# Altium PCB FPV_Template.PcbDoc
Units mm, origin at the board's own origin, x right, y up, seen from the top; angles counter-clockwise.
Board outline 36.8 x 36.8 mm, 4 copper layers (Top Layer, Mid Layer 1, Mid Layer 2, Bottom Layer), stack 1.65 mm thick; 217 components, 138 nets, 1039 pads, 4 vias.
Unrouted connection lines stored in the file: 442.
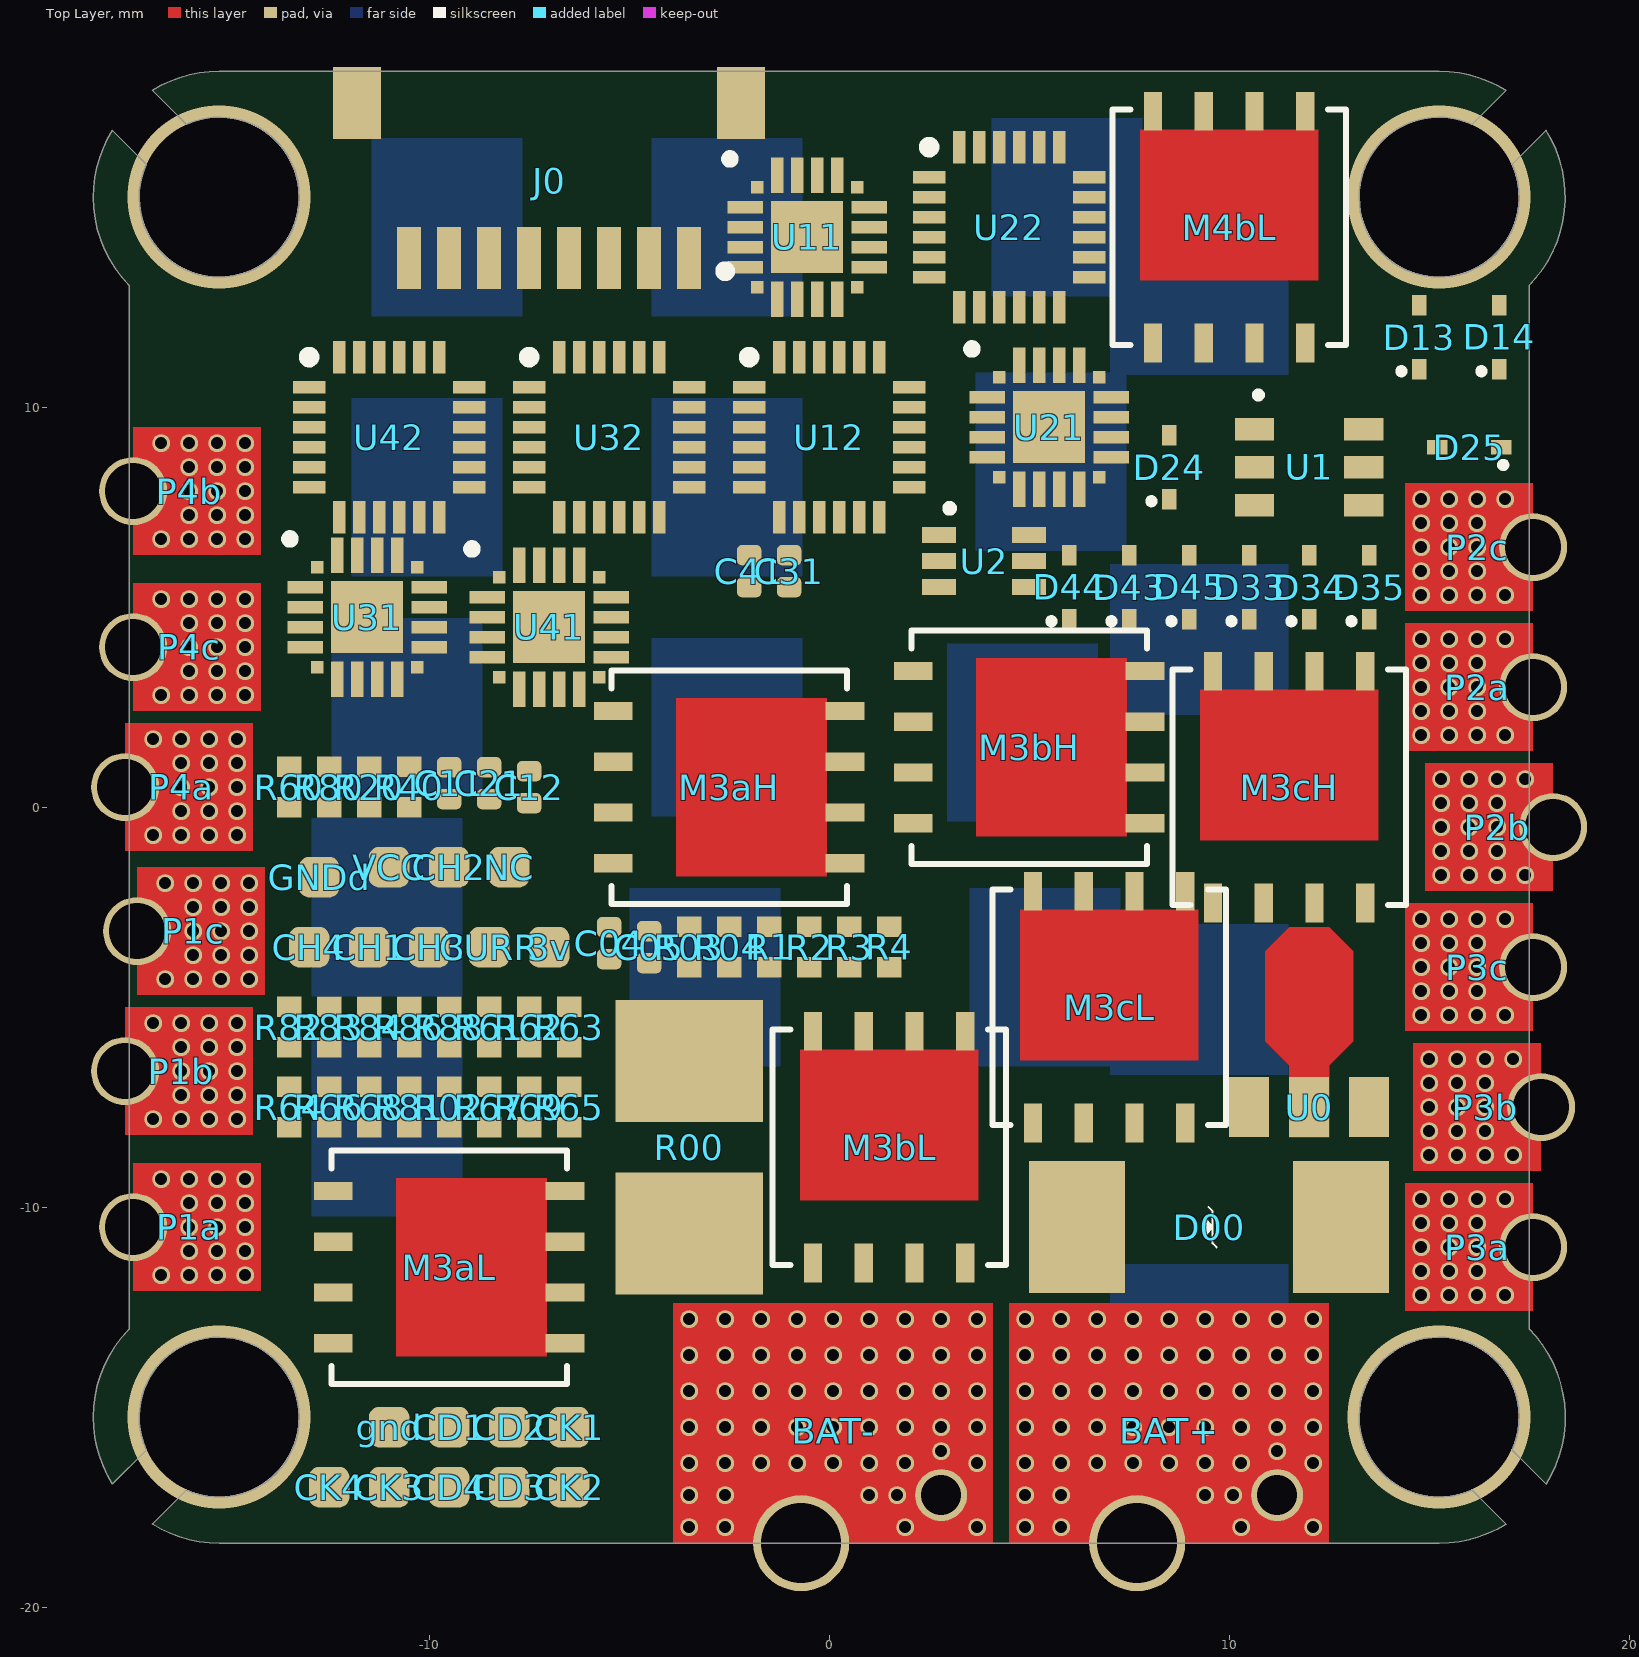
[diagram p0: Top Layer view]
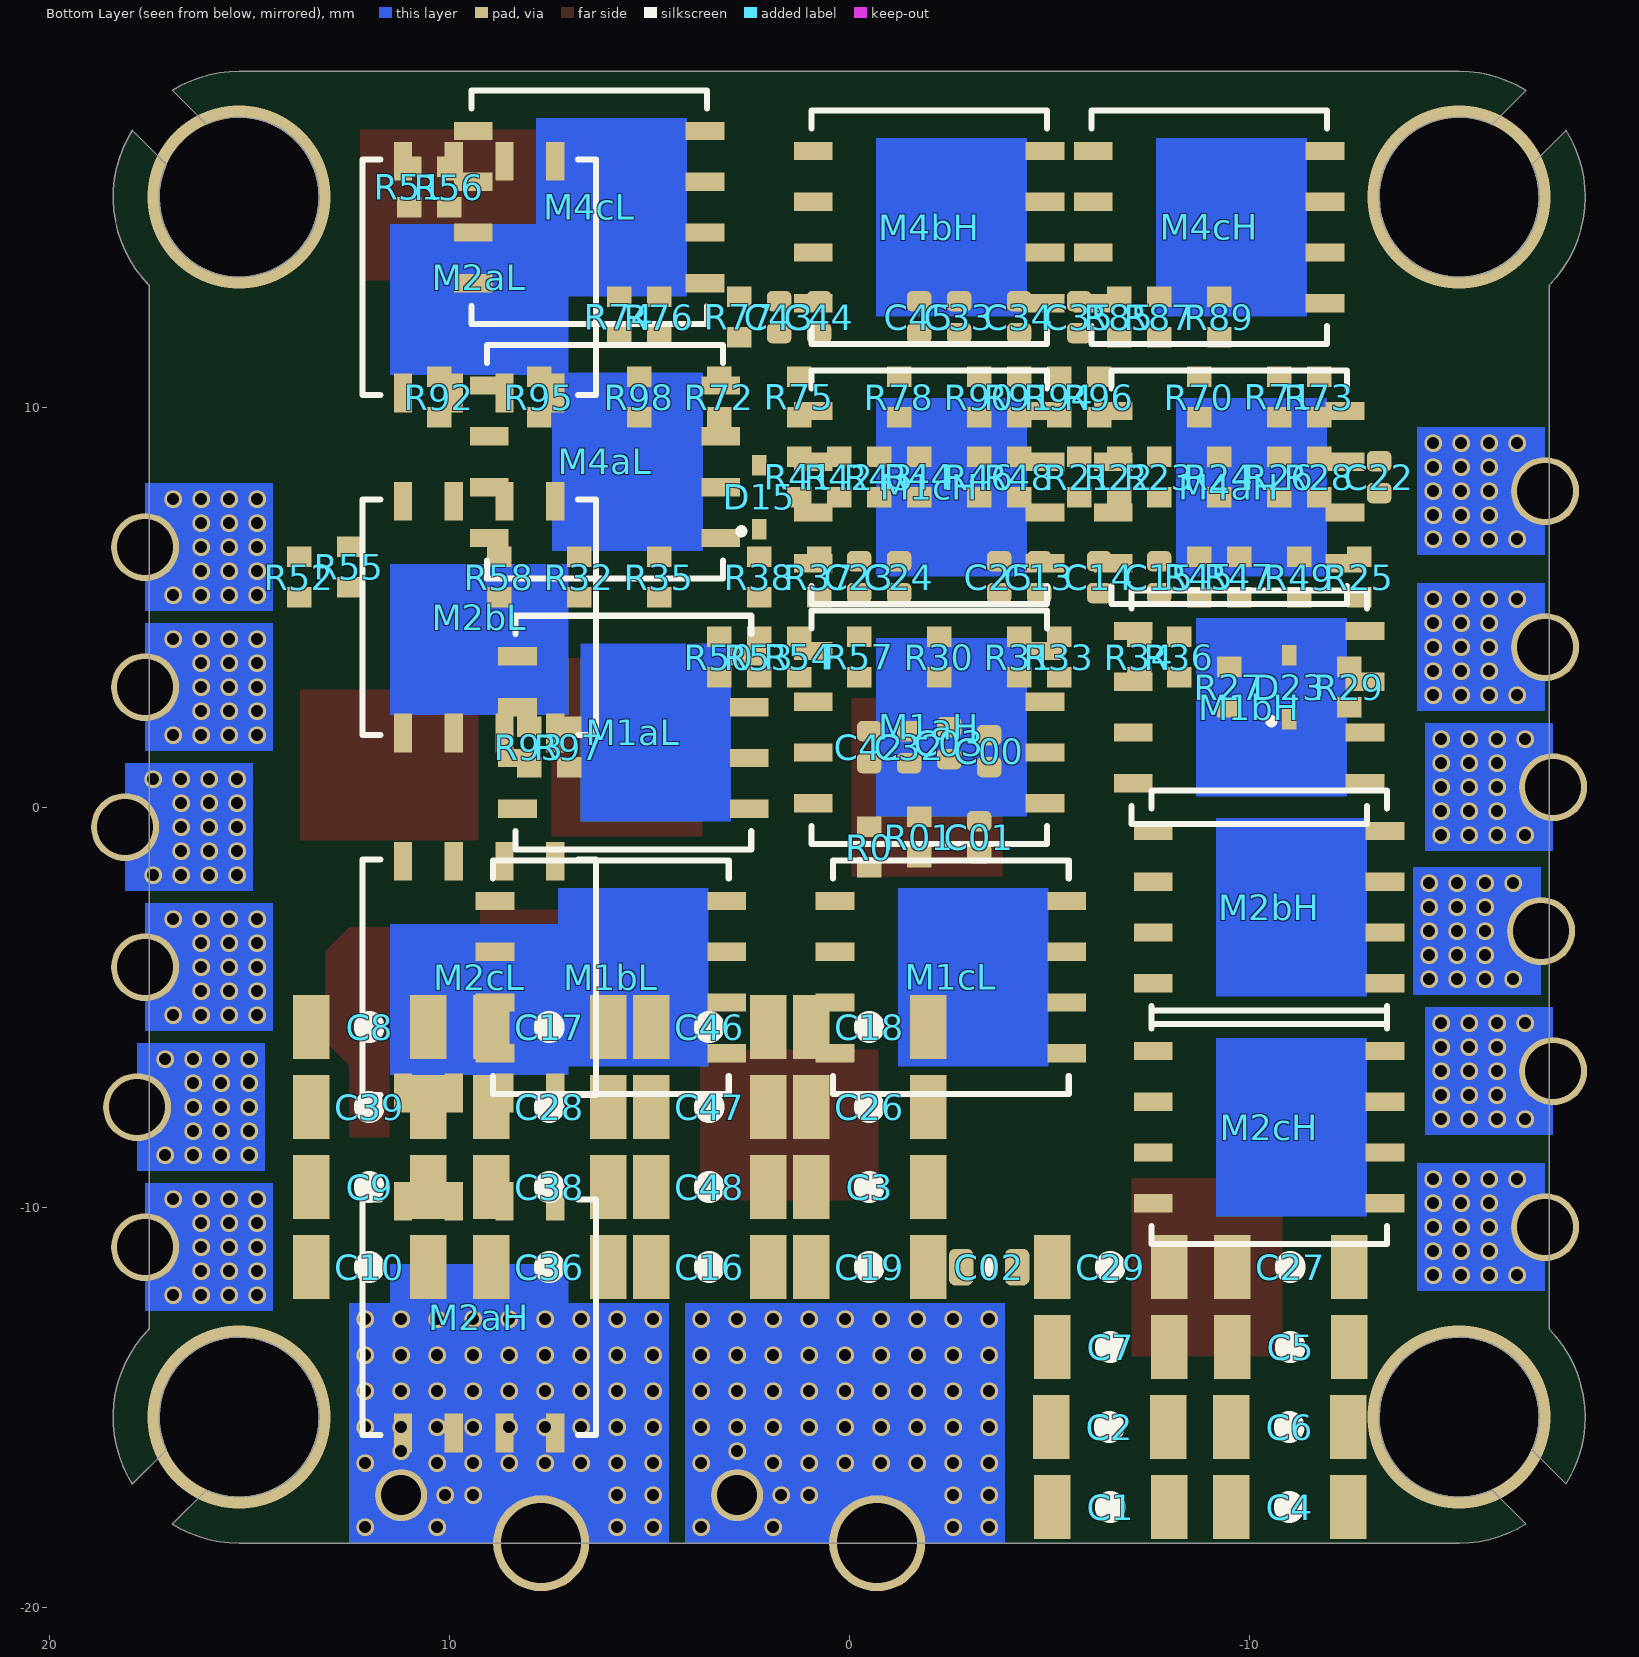
[diagram p1: Bottom Layer view, seen from below]

## Layer stack, top to bottom
Top Solder: solder mask 0.0127, Solder Resist, Dk 3.8
Top Layer: signal copper 0.075
Dielectric 1: prepreg 0.1, 2313, Dk 4.05
Mid Layer 1: signal copper 0.0175
Core: core 1.265, FR-4, Dk 4.5
Mid Layer 2: signal copper 0.0175
Dielectric 2: prepreg 0.1, 2313, Dk 4.05
Bottom Layer: signal copper 0.075
Bottom Solder: solder mask 0.0127, Solder Resist, Dk 3.8

## Board outline
-17.921,-16.919 -17.07,-16.07 -17.077,-16.063 cw(c-15.25,-15.25) -16.063,-17.077 -16.07,-17.07 -16.92,-17.92 -16.919,-17.921 ccw(c-15.25,-15.25) -15.25,-18.4 15.25,-18.4 15.25,-18.402 ccw(c15.25,-15.25) 16.921,-17.923 16.922,-17.922 16.07,-17.07 16.063,-17.077 cw(c15.25,-15.25) 17.077,-16.063 17.07,-16.07 17.922,-16.922 17.923,-16.921 ccw(c15.25,-15.25) 17.499,-13.04 17.5,-13 17.5,13 17.497,13.042 ccw(c15.25,15.25) 17.921,16.919 17.92,16.92 17.07,16.07 17.077,16.063 cw(c15.25,15.25) 16.063,17.077 16.07,17.07 16.92,17.92 16.919,17.921 ccw(c15.25,15.25) 15.25,18.4 -15.25,18.4 ccw(c-15.25,15.25) -16.919,17.921 -16.92,17.92 -16.07,17.07 -16.063,17.077 cw(c-15.25,15.25) -17.077,16.063 -17.07,16.07 -17.92,16.92 -17.921,16.919 ccw(c-15.25,15.25) -18.4,15.25 ccw(c-15.25,15.25) -17.497,13.042 -17.5,13 -17.5,-13 -17.497,-13.042 ccw(c-15.25,-15.25) -18.4,-15.25 ccw(c-15.25,-15.25)

## Design rules (kind name [scope] priority, off if disabled: settings)
BoardOutlineClearance [All] p1: gap=0.2 ignorepadtopadclearanceinfootprint=FALSE
Clearance ClearanceMidLayer1 [OnLayer('Mid Layer 1') Or IsVia Or IsThruPin vs OnLayer('Mid Layer 1')] p1: gap=0.102 ignorepadtopadclearanceinfootprint=FALSE except(0.127: Arc-Via Track-Via SMDPad-Via THPad-Via Via-Via Via-Fill Via-Poly Via-Region Via-Text; 0.25: Arc-Hole Track-Hole SMDPad-Hole THPad-Hole Via-Hole Fill-Hole Poly-Hole Region-Hole Text-Hole)
Clearance ClearanceTopLayer [OnLayer('Top Layer') Or IsVia Or IsThruPin vs OnLayer('Top Layer') Or IsVia Or IsThruPin] p2: gap=0.203 ignorepadtopadclearanceinfootprint=FALSE except(0.25: Arc-Hole Track-Hole SMDPad-Hole THPad-Hole Via-Hole Fill-Hole Poly-Hole Region-Hole Text-Hole)
Clearance ClearanceBottomLayer [OnLayer('Bottom Layer') Or IsVia Or IsThruPin vs OnLayer('Bottom Layer') Or IsVia Or IsThruPin] p3: gap=0.203 ignorepadtopadclearanceinfootprint=FALSE except(0.25: Arc-Hole Track-Hole SMDPad-Hole THPad-Hole Via-Hole Fill-Hole Poly-Hole Region-Hole Text-Hole)
Clearance ClearanceMidLayer2 [OnLayer('Mid Layer 2') Or IsVia Or IsThruPin vs OnLayer('Mid Layer 2')] p4: gap=0.102 ignorepadtopadclearanceinfootprint=FALSE except(0.127: Arc-Via Track-Via SMDPad-Via THPad-Via Via-Via Via-Fill Via-Poly Via-Region Via-Text; 0.25: Arc-Hole Track-Hole SMDPad-Hole THPad-Hole Via-Hole Fill-Hole Poly-Hole Region-Hole Text-Hole)
ComponentClearance [All] p1: gap=0.102 collisioncheckmode=3 verticalgap=0.102 showdistances=TRUE
DiffPairsRouting [All] p1: maxlimit=0.203 minlimit=0.102 mostfreqgap=0.203 toplayer_mingap=0.203 toplayer_minwidth=0.203 toplayer_maxwidth=1816.048 toplayer_prefwidth=0.203 midlayer1_maxgap=0.102 midlayer1_prefgap=0.102 midlayer1_minwidth=0.102 midlayer1_maxwidth=1816.048 midlayer1_prefwidth=0.102 midlayer2_maxgap=0.102 midlayer2_prefgap=0.102 midlayer2_minwidth=0.102 midlayer2_maxwidth=1816.048 midlayer2_prefwidth=0.102 bottomlayer_mingap=0.203 bottomlayer_minwidth=0.203 bottomlayer_maxwidth=1816.048 bottomlayer_prefwidth=0.203 maxuncoupledlength=12.7
Height [All] p1: minheight=0 maxheight=1816.048 prefheight=12.7
HoleSize [All] p1: absolutevalues=TRUE maxlimit=6.3 minlimit=0.2 maxpercent=80.000 minpercent=20.000
HoleToHoleClearance [All] p1: gap=0.25 allowstackedmicrovias=FALSE
MinimumAnnularRing [All] p1: minimumring=0.076
MinimumSolderMaskSliver [All] p1: minsoldermaskwidth=0
PlaneClearance PlaneClearanceMidLayer1 [OnLayer('Mid Layer 1')] p1: clearance=0.102
PlaneClearance PlaneClearanceMidLayer2 [OnLayer('Mid Layer 2')] p2: clearance=0.102
PlaneClearance PlaneClearanceTopLayer [OnLayer('Top Layer')] p3: clearance=0.203
PlaneClearance PlaneClearanceBottomLayer [OnLayer('Bottom Layer')] p4: clearance=0.203
PlaneConnect PlaneConnectPowerPads [InPadClass('PowerPads')] p1: planeconnectstyle=Direct reliefexpansion=0.508 reliefentries=4 reliefconductorwidth=0.254 reliefairgap=0.254
PlaneConnect PlaneConnectTopLayer [OnLayer('Top Layer')] p2: pad.planeconnectstyle=Relief pad.reliefexpansion=0.3 pad.reliefentries=4 pad.reliefconductorwidth=0.203 pad.reliefairgap=0.203 via.planeconnectstyle=Direct via.reliefexpansion=0.3 via.reliefentries=4 via.reliefconductorwidth=0.127 via.reliefairgap=0.127
PlaneConnect PlaneConnectBottomLayer [OnLayer('Bottom Layer')] p3: pad.planeconnectstyle=Relief pad.reliefexpansion=0.3 pad.reliefentries=4 pad.reliefconductorwidth=0.203 pad.reliefairgap=0.203 via.planeconnectstyle=Direct via.reliefexpansion=0.3 via.reliefentries=4 via.reliefconductorwidth=0.127 via.reliefairgap=0.127
PlaneConnect PlaneConnectMidLayer1 [OnLayer('Mid Layer 1')] p4: pad.planeconnectstyle=Relief pad.reliefexpansion=0.3 pad.reliefentries=4 pad.reliefconductorwidth=0.102 pad.reliefairgap=0.102 via.planeconnectstyle=Direct via.reliefexpansion=0.3 via.reliefentries=4 via.reliefconductorwidth=0.127 via.reliefairgap=0.127
PlaneConnect PlaneConnectMidLayer2 [OnLayer('Mid Layer 2')] p5: pad.planeconnectstyle=Relief pad.reliefexpansion=0.3 pad.reliefentries=4 pad.reliefconductorwidth=0.102 pad.reliefairgap=0.102 via.planeconnectstyle=Direct via.reliefexpansion=0.3 via.reliefentries=4 via.reliefconductorwidth=0.127 via.reliefairgap=0.127
PolygonConnect PolygonConnectPowerPads [All vs (InPadClass('PowerPads'))] p1: connectstyle=Direct reliefconductorwidth=0.254 reliefentries=4 polygonreliefangle="90 Angle" airgapwidth=0.254
PolygonConnect PolygonConnectMidLayer1 [OnLayer('Mid Layer 1') vs OnLayer('Mid Layer 1')] p2: thpad.connectstyle=Relief thpad.reliefconductorwidth=0.102 thpad.reliefentries=4 thpad.polygonreliefangle="90 Angle" thpad.airgapwidth=0.102 smdpad.connectstyle=Relief smdpad.reliefconductorwidth=0.102 smdpad.reliefentries=4 smdpad.polygonreliefangle="90 Angle" smdpad.airgapwidth=0.102 via.connectstyle=Direct via.reliefconductorwidth=0.127 via.reliefentries=4 via.polygonreliefangle="90 Angle" via.airgapwidth=0.127
PolygonConnect PolygonConnectMidLayer2 [OnLayer('Mid Layer 2') vs OnLayer('Mid Layer 2')] p3: thpad.connectstyle=Relief thpad.reliefconductorwidth=0.102 thpad.reliefentries=4 thpad.polygonreliefangle="90 Angle" thpad.airgapwidth=0.102 smdpad.connectstyle=Relief smdpad.reliefconductorwidth=0.102 smdpad.reliefentries=4 smdpad.polygonreliefangle="90 Angle" smdpad.airgapwidth=0.102 via.connectstyle=Direct via.reliefconductorwidth=0.127 via.reliefentries=4 via.polygonreliefangle="90 Angle" via.airgapwidth=0.127
PolygonConnect PolygonConnectTopLayer [OnLayer('Top Layer') vs OnLayer('Top Layer')] p4: thpad.connectstyle=Relief thpad.reliefconductorwidth=0.203 thpad.reliefentries=4 thpad.polygonreliefangle="90 Angle" thpad.airgapwidth=0.203 smdpad.connectstyle=Relief smdpad.reliefconductorwidth=0.203 smdpad.reliefentries=4 smdpad.polygonreliefangle="90 Angle" smdpad.airgapwidth=0.203 via.connectstyle=Direct via.reliefconductorwidth=0.127 via.reliefentries=4 via.polygonreliefangle="90 Angle" via.airgapwidth=0.127
PolygonConnect PolygonConnectBottomLayer [OnLayer('Bottom Layer') vs OnLayer('Bottom Layer')] p5: thpad.connectstyle=Relief thpad.reliefconductorwidth=0.203 thpad.reliefentries=4 thpad.polygonreliefangle="90 Angle" thpad.airgapwidth=0.203 smdpad.connectstyle=Relief smdpad.reliefconductorwidth=0.203 smdpad.reliefentries=4 smdpad.polygonreliefangle="90 Angle" smdpad.airgapwidth=0.203 via.connectstyle=Direct via.reliefconductorwidth=0.127 via.reliefentries=4 via.polygonreliefangle="90 Angle" via.airgapwidth=0.127
RoutingVias [All] p1: holewidth=0.3 width=0.45 viastyle="Through Hole" minholewidth=0.2 minwidth=0.45 maxholewidth=6.3 maxwidth=6.55
SilkToSilkClearance [All] p1: silktosilkclearance=0
SilkToSolderMaskClearance [IsPad] p1: minsilkscreentomaskgap=0.102 clearancetoexposedcopper=TRUE
SolderMaskExpansion [All] p1: expansion=0.075 istentingtop=FALSE
Width [All] p1: maxlimit=1816.048 minlimit=0.102 preferedwidth=0.203 toplayer_minwidth=0.203 midlayer1_prefwidth=0.102 midlayer2_prefwidth=0.102 bottomlayer_minwidth=0.203 minimp=50.000000 maximp=50.000000 favimp=50.000000
20 further rules are at their usual default settings.

## Classes and differential pairs
component class mcu: C31 C32 C33 C34 C35 C41 C42 C43 C44 C45 CD3 CD4 CK3 CK4 D33 D34 D35 D43 D44 D45 R60 R61 R62 R63 R64 R65 R66 R67 R68 R69 R70 R71 R72 R73 R74 R75 R76 R77 R78 R80 R81 R82 R83 R84 R85 R86 R87 R88 R89 R90 R91 R92 R93 R94 R95 R96 R97 R98 U31 U32 U41 U42
component class mcu2: C11 C12 C13 C14 C15 C21 C22 C23 C24 C25 CD1 CD2 CK1 CK2 D13 D14 D15 D23 D24 D25 R20 R21 R22 R23 R24 R25 R26 R27 R28 R29 R30 R31 R32 R33 R34 R35 R36 R37 R38 R40 R41 R42 R43 R44 R45 R46 R47 R48 R49 R50 R51 R52 R53 R54 R55 R56 R57 R58 U11 U12 U21 U22
component class main: 3v BAT+ BAT- C00 C01 C1 C2 C02 C03 C3 C4 C04 C05 C5 C6 C7 C8 C9 C10 C16 C17 C18 C19 C26 C27 C28 C29 C36 C38 C39 C46 C47 C48 CH1 CH2 CH3 CH4 CURR D00 gnd GNDd J0 L00 M1aH M1aL M1bH M1bL M1cH M1cL M2aH M2aL M2bH M2bL M2cH M2cL M3aH M3aL M3bH M3bL M3cH M3cL M4aH M4aL M4bH M4bL M4cH M4cL NC P1a P1b P1c P2a P2b P2c P3a P3b P3c P4a P4b P4c R0 R00 R1 R01 R02 R2 R3 R03 R04 R4 U0 U1 U2 VCC

## Components (designator, comment, footprint, x,y, rotation, side; value= is the part's Value field where it differs from the comment)
3v "PAD.04" PAD.04X.04 -7,-3.5 r0 top
BAT+ "X PAD.PWR" PAD6x8 8.5,-16.8 r270 top
BAT- "X PAD.PWR" PAD6x8 0.1,-16.8 r270 top
C00 "CAP0402_0u1_50V_X7R" 0402-CAP -3.5,1.4 r90 bottom value=0u1
C1 "22u" 1206-CAP -6.527,-17.5 r180 bottom value=22uF
C01 "CAP0402_0u1_50V_X7R" 0402-CAP -3.25,-0.75 r90 bottom value=0u1
C2 "22u" 1206-CAP -6.5,-15.5 r180 bottom value=22uF
C02 "CAP0603_4u7_35V_X5R" 0603-CAP -3.5,-11.5 r180 bottom value=4.7u
C3 "22u" 1206-CAP -0.5,-9.5 r180 bottom value=22uF
C03 "CAP0402_10u_10V_X5R" 0402-CAP -2.5,1.6 r90 bottom value=10u
C4 "22u" 1206-CAP -11,-17.5 r180 bottom value=22uF
C04 "CAP0402_0u1_16" 0402-CAP -5.5,-3.4 r90 top value=0u1
C5 "22u" 1206-CAP -11.027,-13.5 r180 bottom value=22uF
C05 "CAP0402_1n_50V_X7R" 0402-CAP -4.5,-3.5 r270 top value=1n
C6 "22u" 1206-CAP -11,-15.5 r180 bottom value=22uF
C7 "22u" 1206-CAP -6.527,-13.5 r180 bottom value=22uF
C8 "22u" 1206-CAP 12,-5.5 r180 bottom value=22uF
C9 "22u" 1206-CAP 12,-9.5 r180 bottom value=22uF
C10 "22u" 1206-CAP 12,-11.5 r180 bottom value=22uF
C11 "CAP0402_0u1" 0402-CAP -9.5,0.6 r90 top value=0u1
C12 "CAP0402_0u1" 0402-CAP -7.5,0.5 r270 top value=0u1
C13 "CAP0402_1u" 0402-CAP -4.75,5.75 r90 bottom value=1u
C14 "CAP0402_1u" 0402-CAP -6.25,5.75 r90 bottom value=1u
C15 "CAP0402_1u" 0402-CAP -7.75,5.75 r90 bottom value=1u
C16 "22u" 1206-CAP 3.5,-11.5 r180 bottom value=22uF
C17 "22u" 1206-CAP 7.5,-5.5 r180 bottom value=22uF
C18 "22u" 1206-CAP -0.5,-5.5 r180 bottom value=22uF
C19 "22u" 1206-CAP -0.5,-11.5 r180 bottom value=22uF
C21 "CAP0402_0u1" 0402-CAP -8.5,0.6 r90 top value=0u1
C22 "CAP0402_0u1" 0402-CAP -13.25,8.25 r90 bottom value=0u1
C23 "CAP0402_1u" 0402-CAP -0.25,5.75 r90 bottom value=1u
C24 "CAP0402_1u" 0402-CAP -1.25,5.75 r90 bottom value=1u
C25 "CAP0402_1u" 0402-CAP -3.75,5.75 r90 bottom value=1u
C26 "22u" 1206-CAP -0.5,-7.5 r180 bottom value=22uF
C27 "22u" 1206-CAP -11.027,-11.5 r180 bottom value=22uF
C28 "22u" 1206-CAP 7.5,-7.5 r180 bottom value=22uF
C29 "22u" 1206-CAP -6.527,-11.5 r180 bottom value=22uF
C31 "CAP0402_0u1" 0402-CAP -1,5.9 r90 top value=0u1
C32 "CAP0402_0u1" 0402-CAP -1.5,1.5 r90 bottom value=0u1
C33 "CAP0402_1u" 0402-CAP -2.75,12.25 r90 bottom value=1u
C34 "CAP0402_1u" 0402-CAP -4.25,12.25 r90 bottom value=1u
C35 "CAP0402_1u" 0402-CAP -5.75,12.25 r90 bottom value=1u
C36 "22u" 1206-CAP 7.5,-11.5 r180 bottom value=22uF
C38 "22u" 1206-CAP 7.5,-9.5 r180 bottom value=22uF
C39 "22u" 1206-CAP 12,-7.5 r180 bottom value=22uF
C41 "CAP0402_0u1" 0402-CAP -2,5.9 r90 top value=0u1
C42 "CAP0402_0u1" 0402-CAP -0.5,1.5 r90 bottom value=0u1
C43 "CAP0402_1u" 0402-CAP 1.75,12.25 r90 bottom value=1u
C44 "CAP0402_1u" 0402-CAP 0.75,12.25 r90 bottom value=1u
C45 "CAP0402_1u" 0402-CAP -1.75,12.25 r90 bottom value=1u
C46 "22u" 1206-CAP 3.5,-5.5 r180 bottom value=22uF
C47 "22u" 1206-CAP 3.5,-7.5 r180 bottom value=22uF
C48 "22u" 1206-CAP 3.5,-9.5 r180 bottom value=22uF
CD1 "PAD.04" PAD.04X.04 -9.5,-15.5 r90 top
CD2 "PAD.04" PAD.04X.04 -8,-15.5 r90 top
CD3 "PAD.04" PAD.04X.04 -8,-17 r90 top
CD4 "PAD.04" PAD.04X.04 -9.5,-17 r90 top
CH1 "PAD.04" PAD.04X.04 -11.5,-3.5 r90 top
CH2 "PAD.04" PAD.04X.04 -9.5,-1.5 r90 top
CH3 "PAD.04" PAD.04X.04 -10,-3.5 r90 top
CH4 "PAD.04" PAD.04X.04 -13,-3.5 r90 top
CK1 "PAD.04" PAD.04X.04 -6.5,-15.5 r90 top
CK2 "PAD.04" PAD.04X.04 -6.5,-17 r90 top
CK3 "PAD.04" PAD.04X.04 -11,-17 r90 top
CK4 "PAD.04" PAD.04X.04 -12.5,-17 r90 top
CURR "PAD.04" PAD.04X.04 -8.5,-3.5 r90 top
D00 "SZESD7462N2T5G" SMC-TVS 9.5,-10.5 r180 top
D13 "DPWR_1N4148WT" SOD-523_0P9X1P3 14.75,11.75 r90 top
D14 "DPWR_1N4148WT" SOD-523_0P9X1P3 16.75,11.75 r90 top
D15 "DPWR_1N4148WT" SOD-523_0P9X1P3 2.25,7.75 r90 bottom
D23 "DPWR_1N4148WT" SOD-523_0P9X1P3 -11,3 r90 bottom
D24 "DPWR_1N4148WT" SOD-523_0P9X1P3 8.5,8.5 r90 top
D25 "DPWR_1N4148WT" SOD-523_0P9X1P3 16,9 r180 top
D33 "DPWR_1N4148WT" SOD-523_0P9X1P3 10.5,5.5 r90 top
D34 "DPWR_1N4148WT" SOD-523_0P9X1P3 12,5.5 r90 top
D35 "DPWR_1N4148WT" SOD-523_0P9X1P3 13.5,5.5 r90 top
D43 "DPWR_1N4148WT" SOD-523_0P9X1P3 7.5,5.5 r90 top
D44 "DPWR_1N4148WT" SOD-523_0P9X1P3 6,5.5 r90 top
D45 "DPWR_1N4148WT" SOD-523_0P9X1P3 9,5.5 r90 top
gnd "PAD.04" PAD.04X.04 -11,-15.5 r90 top
GNDd "PAD.04" PAD.04X.04 -12.75,-1.75 r90 top
J0 "CON R/A SM08B-SRSS-TB" JST_SM08B-SRSS-TB -7,18.5 r180 top
M1aH "NMOS PWR AON6512" 8DFN5X6 -2,2 r180 bottom
M1aL "NMOS PWR AON6512" 8DFN5X6 5.396,1.865 r180 bottom
M1bH "NMOS PWR AON6512" 8DFN5X6 -10,2.5 r180 bottom
M1bL "NMOS PWR AON6512" 8DFN5X6 5.958,-4.25 r180 bottom
M1cH "NMOS PWR AON6512" 8DFN5X6 -2,8 r180 bottom
M1cL "NMOS PWR AON6512" 8DFN5X6 -2.542,-4.25 r180 bottom
M2aH "NMOS PWR AON6512" 8DFN5X6 9.25,-12.75 r270 bottom
M2aL "NMOS PWR AON6512" 8DFN5X6 9.25,13.25 r270 bottom
M2bH "NMOS PWR AON6512" 8DFN5X6 -10.5,-2.5 r180 bottom
M2bL "NMOS PWR AON6512" 8DFN5X6 9.25,4.75 r270 bottom
M2cH "NMOS PWR AON6512" 8DFN5X6 -10.5,-8 r180 bottom
M2cL "NMOS PWR AON6512" 8DFN5X6 9.25,-4.25 r270 bottom
M3aH "NMOS PWR AON6512" 8DFN5X6 -2.5,0.5 r0 top
M3aL "NMOS PWR AON6512" 8DFN5X6 -9.5,-11.5 r0 top
M3bH "NMOS PWR AON6512" 8DFN5X6 5,1.5 r0 top
M3bL "NMOS PWR AON6512" 8DFN5X6 1.5,-8.5 r90 top
M3cH "NMOS PWR AON6512" 8DFN5X6 11.5,0.5 r90 top
M3cL "NMOS PWR AON6512" 8DFN5X6 7,-5 r90 top
M4aH "NMOS PWR AON6512" 8DFN5X6 -9.5,8 r180 bottom
M4aL "NMOS PWR AON6512" 8DFN5X6 6.104,8.635 r180 bottom
M4bH "NMOS PWR AON6512" 8DFN5X6 -2,14.5 r180 bottom
M4bL "NMOS PWR AON6512" 8DFN5X6 10,14.5 r90 top
M4cH "NMOS PWR AON6512" 8DFN5X6 -9,14.5 r180 bottom
M4cL "NMOS PWR AON6512" 8DFN5X6 6.5,15 r180 bottom
NC "PAD.04" PAD.04X.04 -8,-1.5 r0 top
P1a "PAD.04" PAD3.2x3.2 -15.8,-10.5 r180 top
P1b "PAD.04" PAD3.2x3.2 -16,-6.6 r180 top
P1c "PAD.04" PAD3.2x3.2 -15.7,-3.1 r180 top
P2a "PAD.04" PAD3.2x3.2 16,3 r0 top
P2b "PAD.04" PAD3.2x3.2 16.5,-0.5 r0 top
P2c "PAD.04" PAD3.2x3.2 16,6.5 r0 top
P3a "PAD.04" PAD3.2x3.2 16,-11 r0 top
P3b "PAD.04" PAD3.2x3.2 16.2,-7.5 r0 top
P3c "PAD.04" PAD3.2x3.2 16,-4 r0 top
P4a "PAD.04" PAD3.2x3.2 -16,0.5 r180 top
P4b "PAD.04" PAD3.2x3.2 -15.8,7.9 r180 top
P4c "PAD.04" PAD3.2x3.2 -15.8,4 r180 top
R00 "RES2512_1m" 2512-RES -3.5,-8.5 r90 top value=1m
R0 "RES0402_90k9" 0402-RES -0.5,-1 r90 bottom value=90.9k
R1 "RES0402_220" 0402-RES -1.5,-3.5 r90 top value=220
R01 "RES0402_10k" 0402-RES -1.75,-0.75 r90 bottom value=10k
R2 "RES0402_220" 0402-RES -0.5,-3.5 r90 top value=220
R02 "RES0402_90k9" 0402-RES -9.5,-7.5 r90 top value=90.9k
R3 "RES0402_220" 0402-RES 0.5,-3.5 r90 top value=220
R03 "RES0402_22" 0402-RES -3.5,-3.5 r90 top value=22
R4 "RES0402_220" 0402-RES 1.5,-3.5 r90 top value=220
R04 "RES0402_22" 0402-RES -2.5,-3.5 r90 top value=22
R20 "RES0402_10k" 0402-RES -11.5,0.5 r90 top value=10k
R21 "RES0402_22" 0402-RES -5.75,8.25 r90 bottom value=22
R22 "RES0402_22" 0402-RES -6.75,8.25 r90 bottom value=22
R23 "RES0402_22" 0402-RES -7.75,8.25 r90 bottom value=22
R24 "RES0402_22" 0402-RES -9.25,8.25 r90 bottom value=22
R25 "RES0402_10k" 0402-RES -12.75,5.75 r90 bottom value=10k
R26 "RES0402_22" 0402-RES -10.75,8.25 r90 bottom value=22
R27 "RES0402_10k" 0402-RES -9.5,3 r90 bottom value=10k
R28 "RES0402_22" 0402-RES -11.75,8.25 r90 bottom value=22
R29 "RES0402_10k" 0402-RES -12.5,3 r90 bottom value=10k
R30 "RES0402_10k" 0402-RES -2.25,3.75 r90 bottom value=10k
R31 "RES0402_3k3" 0402-RES -4.25,3.75 r90 bottom value=3k3
R32 "RES0402_1k" 0402-RES 6.75,5.75 r90 bottom value=1k
R33 "RES0402_10k" 0402-RES -5.25,3.75 r90 bottom value=10k
R34 "RES0402_3k3" 0402-RES -7.25,3.75 r90 bottom value=3k3
R35 "RES0402_1k" 0402-RES 4.75,5.75 r90 bottom value=1k
R36 "RES0402_10k" 0402-RES -8.25,3.75 r90 bottom value=10k
R37 "RES0402_3k3" 0402-RES 0.75,5.75 r90 bottom value=3k3
R38 "RES0402_1k" 0402-RES 2.25,5.75 r90 bottom value=1k
R40 "RES0402_10k" 0402-RES -10.5,0.5 r90 top value=10k
R41 "RES0402_22" 0402-RES 1.25,8.25 r90 bottom value=22
R42 "RES0402_22" 0402-RES 0.25,8.25 r90 bottom value=22
R43 "RES0402_22" 0402-RES -0.75,8.25 r90 bottom value=22
R44 "RES0402_22" 0402-RES -1.75,8.25 r90 bottom value=22
R45 "RES0402_10k" 0402-RES -8.75,5.75 r90 bottom value=10k
R46 "RES0402_22" 0402-RES -3.25,8.25 r90 bottom value=22
R47 "RES0402_10k" 0402-RES -9.75,5.75 r90 bottom value=10k
R48 "RES0402_22" 0402-RES -4.25,8.25 r90 bottom value=22
R49 "RES0402_10k" 0402-RES -11.25,5.75 r90 bottom value=10k
R50 "RES0402_10k" 0402-RES 3.25,3.75 r90 bottom value=10k
R51 "RES0402_3k3" 0402-RES 11,15.5 r90 bottom value=3k3
R52 "RES0402_1k" 0402-RES 13.75,5.75 r90 bottom value=1k
R53 "RES0402_10k" 0402-RES 2.25,3.75 r90 bottom value=10k
R54 "RES0402_3k3" 0402-RES 1.25,3.75 r90 bottom value=3k3
R55 "RES0402_1k" 0402-RES 12.5,6 r90 bottom value=1k
R56 "RES0402_10k" 0402-RES 10,15.5 r90 bottom value=10k
R57 "RES0402_3k3" 0402-RES -0.25,3.75 r90 bottom value=3k3
R58 "RES0402_1k" 0402-RES 8.75,5.75 r90 bottom value=1k
R60 "RES0402_10k" 0402-RES -13.5,0.5 r90 top value=10k
R61 "RES0402_22" 0402-RES -8.5,-5.5 r90 top value=22
R62 "RES0402_22" 0402-RES -7.5,-5.5 r90 top value=22
R63 "RES0402_22" 0402-RES -6.5,-5.5 r90 top value=22
R64 "RES0402_22" 0402-RES -13.5,-7.5 r90 top value=22
R65 "RES0402_10k" 0402-RES -6.5,-7.5 r90 top value=10k
R66 "RES0402_22" 0402-RES -12.5,-7.5 r90 top value=22
R67 "RES0402_10k" 0402-RES -8.5,-7.5 r90 top value=10k
R68 "RES0402_22" 0402-RES -11.5,-7.5 r90 top value=22
R69 "RES0402_10k" 0402-RES -7.5,-7.5 r90 top value=10k
R70 "RES0402_10k" 0402-RES -8.75,10.25 r90 bottom value=10k
R71 "RES0402_3k3" 0402-RES -10.75,10.25 r90 bottom value=3k3
R72 "RES0402_1k" 0402-RES 3.25,10.25 r90 bottom value=1k
R73 "RES0402_10k" 0402-RES -11.75,10.25 r90 bottom value=10k
R74 "RES0402_3k3" 0402-RES 5.75,12.25 r90 bottom value=3k3
R75 "RES0402_1k" 0402-RES 1.25,10.25 r90 bottom value=1k
R76 "RES0402_10k" 0402-RES 4.75,12.25 r90 bottom value=10k
R77 "RES0402_3k3" 0402-RES 2.75,12.25 r90 bottom value=3k3
R78 "RES0402_1k" 0402-RES -1.25,10.25 r90 bottom value=1k
R80 "RES0402_10k" 0402-RES -12.5,0.5 r90 top value=10k
R81 "RES0402_22" 0402-RES -10.5,-7.5 r90 top value=22
R82 "RES0402_22" 0402-RES -13.5,-5.5 r90 top value=22
R83 "RES0402_22" 0402-RES -12.5,-5.5 r90 top value=22
R84 "RES0402_22" 0402-RES -11.5,-5.5 r90 top value=22
R85 "RES0402_10k" 0402-RES -6.75,12.25 r90 bottom value=10k
R86 "RES0402_22" 0402-RES -10.5,-5.5 r90 top value=22
R87 "RES0402_10k" 0402-RES -7.75,12.25 r90 bottom value=10k
R88 "RES0402_22" 0402-RES -9.5,-5.5 r90 top value=22
R89 "RES0402_10k" 0402-RES -9.25,12.25 r90 bottom value=10k
R90 "RES0402_10k" 0402-RES -3.25,10.25 r90 bottom value=10k
R91 "RES0402_3k3" 0402-RES -4.25,10.25 r90 bottom value=3k3
R92 "RES0402_1k" 0402-RES 10.25,10.25 r90 bottom value=1k
R93 "RES0402_10k" 0402-RES 8,1.5 r90 bottom value=10k
R94 "RES0402_3k3" 0402-RES -5.25,10.25 r90 bottom value=3k3
R95 "RES0402_1k" 0402-RES 7.75,10.25 r90 bottom value=1k
R96 "RES0402_10k" 0402-RES -6.25,10.25 r90 bottom value=10k
R97 "RES0402_3k3" 0402-RES 7,1.5 r90 bottom value=3k3
R98 "RES0402_1k" 0402-RES 5.25,10.25 r90 bottom value=1k
U0 "IC PWR AMS1117-3.3 SOT89-3" SOT89-3 12,-5.5 r0 top
U1 "IC PWR JW5026 SOT23-6" SOT23-6 12,8.5 r0 top
U2 "IC PWR INA199C1DCKR SC70-6" SC70-6 3.875,6.15 r0 top
U11 "IC MCU EFM8BB21F16G-C-QFN20R" QFN20_3X3_SIL -0.55,14.25 r0 top
U12 "IC MOSDRV 6288Q 24QFN" QFN-24(4x4) 0,9.25 r0 top
U21 "IC MCU EFM8BB21F16G-C-QFN20R" QFN20_3X3_SIL 5.5,9.5 r0 top
U22 "IC MOSDRV 6288Q 24QFN" QFN-24(4x4) 4.5,14.5 r0 top
U31 "IC MCU EFM8BB21F16G-C-QFN20R" QFN20_3X3_SIL -11.55,4.75 r0 top
U32 "IC MOSDRV 6288Q 24QFN" QFN-24(4x4) -5.5,9.25 r0 top
U41 "IC MCU EFM8BB21F16G-C-QFN20R" QFN20_3X3_SIL -7,4.5 r0 top
U42 "IC MOSDRV 6288Q 24QFN" QFN-24(4x4) -11,9.25 r0 top
VCC "PAD.04" PAD.04X.04 -11,-1.5 r90 top

## Footprints (in the part's own frame and the unit in brackets; to place one, negate y for a bottom-side part, rotate by r counter-clockwise, add the part's x,y. Pads: shape width x height; smd on the part's side, far side on the other; paste and mask are expansions set on the pad)
8DFN5X6 [mil]
  rect 38x18 smd paste+0 mask+0: 1(-114,75) 2(-114,25) 3(-114,-25) 4(-114,-75) 5(114,-75) 6(114,-25) 7(114,25) 8(114,75)
  Top Layer region: 96,-87.5 96,87.5 -52,87.5 -52,-87.5
  silkscreen extent -116,-115 116,115, body extent -121,-110 121,110, height 39
0402-CAP [mil]
  rrect50% 20x24 smd mask+0: P$1(-15.75,0) P$2(15.75,0)
  body extent -20,-10 20,10, height 20
0402-RES [mil] "0402-RES"
  rect 20x24 smd: P$1(-19.68,0) P$2(20,0)
  body extent -20,-10 20,10, height 20
0603-CAP [mil] "0603-CAP"
  rrect50% 24x36 smd mask+0: P$1(-27.56,0) P$2(27.56,0)
  silkscreen extent 0,-2 0,2, body extent -31,-16 31,16, height 34
1206-CAP [mil]
  rect 36x63 smd: P$1(-57.09,0) P$2(58,0)
  silkscreen extent 0,0 0,1, body extent -63,-31 63,31, height 34
2512-RES [mm]
  rect 3.05x3.68 smd paste+0 mask+0: P$1(-2.16,0) P$2(2.16,0)
  body extent -3.23,-1.68 3.23,1.68, height 0.66
JST_SM08B-SRSS-TB [mm]
  rect 0.6x1.55 smd: 1(-3.5,4.775) 2(-2.5,4.775) 3(-1.5,4.775) 4(-0.5,4.775) 5(0.5,4.775) 6(1.5,4.775) 7(2.5,4.775) 8(3.5,4.775)
  rect 1.2x1.8 smd: P1(-4.8,0.9) P2(4.8,0.9)
  silkscreen extent -4.52,4.98 -4.28,5.22, body extent -5,0.3 5,5.25, height 2.95
PAD3.2x3.2 [mm]
  round 1.7 hole 1.4: 1(1.6,0)
  round 0.45 hole 0.3: 2(-1.2,1.2) 2(-1.2,-0.6) 2(-1.2,0) 2(-1.2,0.6) 2(-1.2,-1.2) 2(-0.5,1.2) 2(-0.5,0.6) 2(-0.5,0) 2(-0.5,-0.6) 2(-0.5,-1.2) 2(0.2,1.2) 2(0.2,0.6) 2(0.2,0) 2(0.2,-0.6) 2(0.2,-1.2) 2(0.9,1.2) 2(0.9,-1.2)
  Top Layer region: -1.6,1.6 -1.6,-1.6 1.6,-1.6 1.6,1.6
  Top Layer pour cut-out: 1.6,1.6 1.6,-1.6 2.5,-1.6 2.5,1.6
  Bottom Layer region: -1.6,-1.6 1.6,-1.6 1.6,1.6 -1.6,1.6
PAD6x8 [mm]
  round 2.4 hole 2: 1(1.6,-0.8)
  round 0.45 hole 0.3: 2(-4,2.7) 2(-4,3.6) 2(-4,-1.8) 2(-4,-0.9) 2(-4,0) 2(-4,0.9) 2(-4,1.8) 2(-4,-3.6) 2(-4,-2.7) 2(-3.1,3.6) 2(-3.1,1.8) 2(-3.1,2.7) 2(-3.1,-0.9) 2(-3.1,0) 2(-3.1,0.9) 2(-3.1,-2.7) 2(-3.1,-1.8) 2(-3.1,-3.6) 2(-2.2,3.6) 2(-2.2,1.8) 2(-2.2,2.7) 2(-2.2,-0.9) 2(-2.2,0) 2(-2.2,0.9) 2(-2.2,-2.7) 2(-2.2,-1.8) 2(-2.2,-3.6) 2(-1.3,3.6) 2(-1.3,2.7) 2(-1.3,1.8) 2(-1.3,0.9) 2(-1.3,0) 2(-1.3,-0.9) 2(-1.3,-1.8) 2(-1.3,-2.7) 2(-1.3,-3.6) 2(-0.7,2.7) 2(-0.4,3.6) 2(-0.4,1.8) 2(-0.4,0.9) 2(-0.4,0) 2(-0.4,-0.9) 2(-0.4,-1.8) 2(-0.4,-2.7) 2(-0.4,-3.6) 2(0.4,1.6) 2(0.4,0.9) 2(0.4,-2.7) 2(0.4,-3.6) 2(1.2,3.6) 2(1.2,1.8) 2(1.2,-2.7) 2(1.2,-3.6)
  round 1.3 hole 1: 2(0.4,2.7)
  Top Layer region: -4.4,4 -4.4,-4 1.6,-4 1.6,4
  Bottom Layer region: -4.4,-4 1.6,-4 1.6,4 -4.4,4
PAD.04X.04 [mil]
  rrect50% 40x40 smd paste-78.74: P$1(0,0)
QFN20_3X3_SIL [mil]
  rect 12x12 smd paste+0 mask+0: 1(-49.21,49.21) 6(-49.21,-49.21) 11(49.21,-49.21) 16(49.21,49.21)
  rect 35x12 smd paste+0 mask+0: 2(-61.02,29.53) 3(-61.02,9.84) 4(-61.02,-9.84) 5(-61.02,-29.53) 12(61.02,-29.53) 13(61.02,-9.84) 14(61.02,9.84) 15(61.02,29.53)
  rect 12x35 smd paste+0 mask+0: 7(-29.53,-61.02) 8(-9.84,-61.02) 9(9.84,-61.02) 10(29.53,-61.02) 17(29.53,61.02) 18(9.84,61.02) 19(-9.84,61.02) 20(-29.53,61.02)
  rect 71x71 smd paste+0 mask+0: 21(0,0)
  silkscreen extent -80,73 -72,81, body extent -59,-59 59,59, height 31
QFN-24(4x4) [mm] "QFN-24"
  rect 0.813x0.305 smd: 1(-2,1.25) 2(-2,0.75) 3(-2,0.25) 4(-2,-0.25) 5(-2,-0.75) 6(-2,-1.25) 13(2,-1.25) 14(2,-0.75) 15(2,-0.25) 16(2,0.25) 17(2,0.75) 18(2,1.25)
  rect 0.305x0.813 smd: 7(-1.25,-2) 8(-0.75,-2) 9(-0.25,-2) 10(0.25,-2) 11(0.75,-2) 12(1.25,-2) 19(1.25,2) 20(0.75,2) 21(0.25,2) 22(-0.25,2) 23(-0.75,2) 24(-1.25,2)
  silkscreen extent -2.13,1.87 -1.87,2.13, body extent -2,-2 2,2, height 0.9
SC70-6 [mm]
  rect 0.85x0.4 smd paste+0 mask+0.051: 1(-1.125,0.65) 2(-1.125,0) 3(-1.125,-0.65) 4(1.125,-0.65) 5(1.125,0) 6(1.125,0.65)
  silkscreen extent -0.92,1.26 -0.81,1.38, body extent -1.05,-1 1.05,1, height 1
SMC-TVS [mm] "0402-TVS"
  rect 2.4x3.3 smd: A(3.3,0) C(-3.3,0)
  silkscreen extent -0.19,-0.5 0.08,0.5, body extent -4.06,-3.11 4.06,3.11, height 2.67
SOD-523_0P9X1P3 [mil]
  rect 20x14 smd paste+0 mask+0: A(31.5,0) K(-31.5,0)
  silkscreen extent -37,14 -31,20, body extent -34,-17 34,17, height 18
SOT23-6 [mil]
  rect 38.5x22 smd paste+0 mask+0: 1(-53.75,37.4) 2(-53.75,0) 3(-53.75,-37.4) 4(53.75,-37.4) 5(53.75,0) 6(53.75,37.4)
  silkscreen extent -51,70 -49,72, body extent -59,-59 59,59, height 57
SOT89-3 [mm]
  rect 1x1.5 smd: 1(-1.5,-2) 3(1.5,-2)
  rect 1x1.5 smd paste-2 mask+0: 2(0,-2)
  Top Layer region: 1.1,1.9 1.1,-0.35 0.5,-0.95 0.5,-2.75 -0.5,-2.75 -0.5,-0.95 -1.1,-0.35 -1.1,1.9 -0.5,2.5 0.5,2.5
  body extent -2.25,-2.05 2.25,2.05, height 1.6

## Part data
3v CD1 CD2 CD3 CD4 CH1 CH2 CH3 CH4 CK1 CK2 CK3 CK4 CURR gnd GNDd NC VCC: library part "X PADS.04"
C00 C01: "50V 100nF X7R ±10% 0402 Multilayer Ceramic Capacitors MLCC - SMD/SMT ROHS", Manufacturer Product Number=GRM155R71H104KE14D, Package=0402, Voltage Rating=50, Supplier Part Number 2=C77020
C1 C2 C3 C4 C5 C6 C7 C8 C9 C10 C16 C17 C18 C19 C26 C27 C28 C29 C36 C38 C39 C46 C47 C48: library part CAP1206_22u_35V_X5R, "CAP CER 22UF 35V 20% X5R 1206", Voltage Rating=35V, Supplier Part Number 2=C342620
C02: "35V 4.7uF X5R ±10% 0603 Multilayer Ceramic Capacitors MLCC - SMD/SMT ROHS", Package=0603, Voltage Rating=35V, Supplier Part Number 2=C162274
C03: "10V 10uF X5R ±20% 0402 Multilayer Ceramic Capacitors MLCC - SMD/SMT ROHS", Package=0402, Voltage Rating=10, Supplier Part Number 2=C77000
C04 C11 C12 C21 C22 C31 C32 C41 C42: "X7R 100nF 16V ±10% 0402 Multilayer Ceramic Capacitors MLCC - SMD/SMT ROHS", Package=0402, Supplier Part Number 2=C1525
C05: "50V 1nF X7R ±10% 0402 Multilayer Ceramic Capacitors MLCC - SMD/SMT ROHS", Package=0402, Voltage Rating=50, Supplier Part Number 2=C106205
C13 C14 C15 C23 C24 C25 C33 C34 C35 C43 C44 C45: "X5R 1uF 16V ±10% 0402 Multilayer Ceramic Capacitors MLCC - SMD/SMT ROHS", Package=0402, Supplier Part Number 2=C29266
D00: library part DTVS_SMDJ28CA, "66.1A 45.4V 3kW 31.1V 28V SMC ESD and Surge Protection (TVS/ESD) ROHS", Manufacturer Product Number=SMDJ28CA, Supplier Part Number 2=C2990249
D13 D14 D15 D23 D24 D25 D33 D34 D35 D43 D44 D45: "75V Independent Type 1.25V@150mA 4ns 150mA SOD-523 Switching Diodes ROHS", Manufacturer Product Number=1N4148WT, Package=SOD523, Supplier Part Number 2=C917006
J0: "SH Series 8 Position 1 mm Pitch Surface Mount Side Entry Shrouded Header Right Angle / CONN HEADER SMD R/A 8POS 1MM", Manufacturer Product Number=SM08B-SRSS-TB, Supplier Part Number 1=455-1808-1-ND, Supplier Part Number 2=C160407
M1aH M1aL M1bH M1bL M1cH M1cL M2aH M2aL M2bH M2bL M2cH M2cL M3aH M3aL M3bH M3bL M3cH M3cL M4aH M4aL M4bH M4bL M4cH M4cL: "N-Channel 30 V 54A (Ta), 150A (Tc) 7.4W (Ta), 83W (Tc) Surface Mount 8-DFN (5x6)", Manufacturer Product Number=AON6512, Package=8DFN(5x6), Supplier Part Number 1=785-1366-1-ND, Supplier Part Number 2=C485679
P1a P1b P1c P2a P2b P2c P3a P3b P3c P4a P4b P4c: library part "X PAD.ESC"
R00: "2W 1mΩ Current Sensing Resistors ±50ppm/℃ ±1% 2512 Current Sense Resistors / Shunt Resistors ROHS", Manufacturer Product Number=PA2512FKE7W0R001E, Supplier Part Number 2=C326570
R0 R02: "62.5mW Thick Film Resistors 50V ±100ppm/℃ ±1% 90.9kΩ 0402 Chip Resistor - Surface Mount ROHS", Package=0402, Supplier Part Number 2=C163452
R1 R2 R3 R4: "62.5mW Thick Film Resistors 50V ±100ppm/℃ ±1% 220Ω 0402 Chip Resistor - Surface Mount ROHS", Package=0402, Supplier Part Number 2=C112291
R01 R20 R25 R27 R29 R30 R33 R36 R40 R45 R47 R49 R50 R53 R56 R60 R65 R67 R69 R70 R73 R76 R80 R85 R87 R89 R90 R93 R96: "50V Thick Film Resistors 62.5mW 110kΩ ±1% ±100ppm/℃ 0402 Chip Resistor - Surface Mount ROHS", Package=0402, Supplier Part Number 2=C138065
R03 R04 R21 R22 R23 R24 R26 R28 R41 R42 R43 R44 R46 R48 R61 R62 R63 R64 R66 R68 R81 R82 R83 R84 R86 R88: "62.5mW Thick Film Resistors 50V ±1% ±100ppm/℃ 22Ω 0402 Chip Resistor - Surface Mount ROHS", Package=0402, Supplier Part Number 2=C25092
R31 R34 R37 R51 R54 R57 R71 R74 R77 R91 R94 R97: "62.5mW Thick Film Resistors 50V ±100ppm/℃ ±1% 3.3kΩ 0402 Chip Resistor - Surface Mount ROHS", Package=0402, Supplier Part Number 2=C137992
R32 R35 R38 R52 R55 R58 R72 R75 R78 R92 R95 R98: "62.5mW Thick Film Resistors 50V ±100ppm/℃ ±1% 1kΩ 0402 Chip Resistor - Surface Mount ROHS", Package=0402, Supplier Part Number 2=C11702
U0: "IC LDO REG 3.3V 1A 15Vinmax SOT89-3", Manufacturer Product Number=AMS1117-3.3, Package=SOT89-3, Supplier Part Number 2=C22472154
U1: "Step-down type 1A 4.7V~40V SOT-23-6 DC-DC Converters ROHS", Manufacturer Product Number=JW5026, Package=SOT23-6, Supplier Part Number 2=C185109
U2: "Current Sense Regulator High/Low-Side SC-70-6", Manufacturer Product Number=INA199C1DCKR, Package=SC70-6, Supplier Part Number 1=296-47775-1-ND, Supplier Part Number 2=C2155860
U11 U21 U31 U41: "IC MCU 8BIT 16KB FLASH 20QFN", Manufacturer Productt Number=EFM8BB21F16G-C-QFN20R, Package=20QFN, Supplier Part Number 1=RefDes, Supplier Part Number 2=C80713
U12 U22 U32 U42: "High and low sides MOSFET 1.8A 8V~20V 1.5A QFN-24 Gate Drivers ROHS", Manufacturer Product Number=FD6288Q, Package=24QFN(4x4), Supplier Part Number 2=C328453

## Via types
v1: diameter 4.572, hole 3.975, Top Layer to Bottom Layer, 4 vias

## Nets (pads, with @x,y where several pads share a name; then routed paths per layer and width w, separated by ;. In a path a pad name is that pad's centre, name@x,y a point inside that pad or via, vN(x,y) a via of type N, cw(c..) or ccw(c..) an arc to the next point about the centre after c; other vN are vias at no path point)
+3V3: 3v.P$1 C04.P$1 C11.P$1 C21.P$1 C31.P$1 C41.P$1 R20.P$2 R40.P$2 R60.P$2 R80.P$2 U0.2 U2.3 U11.4 U21.4 U31.4 U41.4
ch1_c2d: CD1.P$1 U11.6
ch1_com_all: R31.P$1 R34.P$1 R37.P$1 U11.20
ch1_hin1: U11.16 U12.22
ch1_hin2: U11.14 U12.23
ch1_hin3: U11.11 U12.24
ch1_ho1: R21.P$1 U12.19
ch1_ho2: R22.P$1 U12.16
ch1_ho3: R23.P$1 U12.13
ch1_in: CH1.P$1 R1.P$1 U11.2
ch1_lin1: U11.15 U12.1
ch1_lin2: U11.13 U12.2
ch1_lin3: U11.10 U12.3
ch1_lo1: R24.P$1 U12.11
ch1_lo2: R26.P$1 U12.10
ch1_lo3: R28.P$1 U12.9
ch1_mux1: R30.P$2 R31.P$2 R32.P$2 U11.19
ch1_mux2: R33.P$2 R34.P$2 R35.P$2 U11.18
ch1_mux3: R36.P$2 R37.P$2 R38.P$2 U11.17
ch1_vb1: C13.P$1 U12.20
ch1_vb2: C14.P$1 U12.17
ch1_vb3: C15.P$1 U12.14
ch2_c2d: CD2.P$1 U21.6
ch2_com_all: R51.P$1 R54.P$1 R57.P$1 U21.20
ch2_hin1: U21.16 U22.22
ch2_hin2: U21.14 U22.23
ch2_hin3: U21.11 U22.24
ch2_ho1: R41.P$1 U22.19
ch2_ho2: R42.P$1 U22.16
ch2_ho3: R43.P$1 U22.13
ch2_in: CH2.P$1 R2.P$1 U21.2
ch2_lin1: U21.15 U22.1
ch2_lin2: U21.13 U22.2
ch2_lin3: U21.10 U22.3
ch2_lo1: R44.P$1 U22.11
ch2_lo2: R46.P$1 U22.10
ch2_lo3: R48.P$1 U22.9
ch2_mux1: R50.P$2 R51.P$2 R52.P$2 U21.19
ch2_mux2: R53.P$2 R54.P$2 R55.P$2 U21.18
ch2_mux3: R56.P$2 R57.P$2 R58.P$2 U21.17
ch2_vb1: C23.P$1 U22.20
ch2_vb2: C24.P$1 U22.17
ch2_vb3: C25.P$1 U22.14
ch3_c2d: CD3.P$1 U31.6
ch3_com_all: R71.P$1 R74.P$1 R77.P$1 U31.20
ch3_hin1: U31.16 U32.22
ch3_hin2: U31.14 U32.23
ch3_hin3: U31.11 U32.24
ch3_ho1: R61.P$1 U32.19
ch3_ho2: R62.P$1 U32.16
ch3_ho3: R63.P$1 U32.13
ch3_in: CH3.P$1 R3.P$1 U31.2
ch3_lin1: U31.15 U32.1
ch3_lin2: U31.13 U32.2
ch3_lin3: U31.10 U32.3
ch3_lo1: R64.P$1 U32.11
ch3_lo2: R66.P$1 U32.10
ch3_lo3: R68.P$1 U32.9
ch3_mux1: R70.P$2 R71.P$2 R72.P$2 U31.19
ch3_mux2: R73.P$2 R74.P$2 R75.P$2 U31.18
ch3_mux3: R76.P$2 R77.P$2 R78.P$2 U31.17
ch3_vb1: C33.P$1 U32.20
ch3_vb2: C34.P$1 U32.17
ch3_vb3: C35.P$1 U32.14
ch4_c2ck: CK1.P$1 CK2.P$1 CK3.P$1 CK4.P$1 R20.P$1 R40.P$1 R60.P$1 R80.P$1 U11.5 U21.5 U31.5 U41.5
ch4_c2d: CD4.P$1 U41.6
ch4_com_all: R91.P$1 R94.P$1 R97.P$1 U41.20
ch4_hin1: U41.16 U42.22
ch4_hin2: U41.14 U42.23
ch4_hin3: U41.11 U42.24
ch4_ho1: R81.P$1 U42.19
ch4_ho2: R82.P$1 U42.16
ch4_ho3: R83.P$1 U42.13
ch4_in: CH4.P$1 R4.P$1 U41.2
ch4_lin1: U41.15 U42.1
ch4_lin2: U41.13 U42.2
ch4_lin3: U41.10 U42.3
ch4_lo1: R84.P$1 U42.11
ch4_lo2: R86.P$1 U42.10
ch4_lo3: R88.P$1 U42.9
ch4_mux1: R90.P$2 R91.P$2 R92.P$2 U41.19
ch4_mux2: R93.P$2 R94.P$2 R95.P$2 U41.18
ch4_mux3: R96.P$2 R97.P$2 R98.P$2 U41.17
ch4_vb1: C43.P$1 U42.20
ch4_vb2: C44.P$1 U42.17
ch4_vb3: C45.P$1 U42.14
curr_sens: CURR.P$1 J0.1 R04.P$2
GND: C01.P$2 C1.P$2 C02.P$2 C2.P$2 C03.P$2 C3.P$2 C4.P$2 C04.P$2 C5.P$2 C6.P$2 C7.P$2 C8.P$1 C9.P$1 C10.P$1 C11.P$2 C12.P$2 C16.P$2 C17.P$2 C18.P$2 C19.P$2 C21.P$2 C22.P$2 C26.P$1 C27.P$1 C28.P$1 C29.P$1 C31.P$2 C32.P$2 C36.P$1 C38.P$1 C39.P$1 C41.P$2 C42.P$2 C46.P$1 C47.P$1 C48.P$2 D00.C gnd.P$1 GNDd.P$1 J0.8 M1aL.1 M1aL.2 M1aL.3 M1bL.1 M1bL.2 M1bL.3 M1cL.1 M1cL.2 M1cL.3 M2aL.1 M2aL.2 M2aL.3 M2bL.1 M2bL.2 M2bL.3 M2cL.1 M2cL.2 M2cL.3 M3aL.1 M3aL.2 M3aL.3 M3bL.1 M3bL.2 M3bL.3 M3cL.1 M3cL.2 M3cL.3 M4aL.1 M4aL.2 M4aL.3 M4bL.1 M4bL.2 M4bL.3 M4cL.1 M4cL.2 M4cL.3 R01.P$1 R25.P$2 R27.P$2 R29.P$2 R32.P$1 R35.P$1 R38.P$1 R45.P$2 R47.P$2 R49.P$2 R52.P$1 R55.P$1 R58.P$1 R65.P$2 R67.P$2 R69.P$2 R72.P$1 R75.P$1 R78.P$1 R85.P$2 R87.P$2 R89.P$2 R92.P$1 R95.P$1 R98.P$1 U0.1 U1.2 U2.1 U2.2 U11.3 U11.12 U11.21 U12.6 U21.3 U21.12 U21.21 U22.6 U31.3 U31.12 U31.21 U32.6 U41.3 U41.12 U41.21 U42.6
M1a: C13.P$2 M1aH.1 M1aH.2 M1aH.3 M1aL.5 M1aL.6 M1aL.7 M1aL.8 R30.P$1 U12.18
M1a_HG: M1aH.4 R21.P$2
M1a_LG: M1aL.4 R24.P$2 R25.P$1
M1b: C14.P$2 M1bH.1 M1bH.2 M1bH.3 M1bL.5 M1bL.6 M1bL.7 M1bL.8 R33.P$1 U12.15
M1b_HG: M1bH.4 R22.P$2
M1b_LG: M1bL.4 R26.P$2 R27.P$1
M1c: C15.P$2 M1cH.1 M1cH.2 M1cH.3 M1cL.5 M1cL.6 M1cL.7 M1cL.8 R36.P$1 U12.12
M1c_HG: M1cH.4 R23.P$2
M1c_LG: M1cL.4 R28.P$2 R29.P$1
M2a: C23.P$2 M2aH.1 M2aH.2 M2aH.3 M2aL.5 M2aL.6 M2aL.7 M2aL.8 R50.P$1 U22.18
M2a_HG: M2aH.4 R41.P$2
M2a_LG: M2aL.4 R44.P$2 R45.P$1
M2b: C24.P$2 M2bH.1 M2bH.2 M2bH.3 M2bL.5 M2bL.6 M2bL.7 M2bL.8 R53.P$1 U22.15
M2b_HG: M2bH.4 R42.P$2
M2b_LG: M2bL.4 R46.P$2 R47.P$1
M2c: C25.P$2 M2cH.1 M2cH.2 M2cH.3 M2cL.5 M2cL.6 M2cL.7 M2cL.8 R56.P$1 U22.12
M2c_HG: M2cH.4 R43.P$2
M2c_LG: M2cL.4 R48.P$2 R49.P$1
M3a: C33.P$2 M3aH.1 M3aH.2 M3aH.3 M3aL.5 M3aL.6 M3aL.7 M3aL.8 R70.P$1 U32.18
M3a_HG: M3aH.4 R61.P$2
M3a_LG: M3aL.4 R64.P$2 R65.P$1
M3b: C34.P$2 M3bH.1 M3bH.2 M3bH.3 M3bL.5 M3bL.6 M3bL.7 M3bL.8 R73.P$1 U32.15
M3b_HG: M3bH.4 R62.P$2
M3b_LG: M3bL.4 R66.P$2 R67.P$1
M3c: C35.P$2 M3cH.1 M3cH.2 M3cH.3 M3cL.5 M3cL.6 M3cL.7 M3cL.8 R76.P$1 U32.12
M3c_HG: M3cH.4 R63.P$2
M3c_LG: M3cL.4 R68.P$2 R69.P$1
M4a: C43.P$2 M4aH.1 M4aH.2 M4aH.3 M4aL.5 M4aL.6 M4aL.7 M4aL.8 R90.P$1 U42.18
M4a_HG: M4aH.4 R81.P$2
M4a_LG: M4aL.4 R84.P$2 R85.P$1
M4b: C44.P$2 M4bH.1 M4bH.2 M4bH.3 M4bL.5 M4bL.6 M4bL.7 M4bL.8 R93.P$1 U42.15
M4b_HG: M4bH.4 R82.P$2
M4b_LG: M4bL.4 R86.P$2 R87.P$1
M4c: C45.P$2 M4cH.1 M4cH.2 M4cH.3 M4cL.5 M4cL.6 M4cL.7 M4cL.8 R96.P$1 U42.12
M4c_HG: M4cH.4 R83.P$2
M4c_LG: M4cL.4 R88.P$2 R89.P$1
NC: J0.2 NC.P$1
NetC00_P$1: C00.P$1 U1.6
NetC00_P$2: C00.P$2 U1.1
NetJ0_3: J0.3 R4.P$2
NetJ0_4: J0.4 R3.P$2
NetJ0_5: J0.5 R2.P$2
NetJ0_6: J0.6 R1.P$2
NetR0_P$1: R0.P$1 U1.4
NetR01_P$2: R01.P$2 R02.P$1 U1.3
NetR03_P$1: R03.P$1 U2.6
NetR03_P$2: R03.P$2 R04.P$1
PVDD: C03.P$1 C12.P$1 C22.P$1 C32.P$1 C42.P$1 R02.P$2 U0.3 U12.4 U22.4 U32.4 U42.4
PWR: C1.P$1 C01.P$1 C02.P$1 C2.P$1 C3.P$1 C4.P$1 C5.P$1 C05.P$2 C6.P$1 C7.P$1 C8.P$2 C9.P$2 C10.P$2 C16.P$1 C17.P$1 C18.P$1 C19.P$1 C26.P$2 C27.P$2 C28.P$2 C29.P$2 C36.P$2 C38.P$2 C39.P$2 C46.P$2 C47.P$2 C48.P$1 D00.A J0.7 M1aH.5 M1aH.6 M1aH.7 M1aH.8 M1bH.5 M1bH.6 M1bH.7 M1bH.8 M1cH.5 M1cH.6 M1cH.7 M1cH.8 M2aH.5 M2aH.6 M2aH.7 M2aH.8 M2bH.5 M2bH.6 M2bH.7 M2bH.8 M2cH.5 M2cH.6 M2cH.7 M2cH.8 M3aH.5 M3aH.6 M3aH.7 M3aH.8 M3bH.5 M3bH.6 M3bH.7 M3bH.8 M3cH.5 M3cH.6 M3cH.7 M3cH.8 M4aH.5 M4aH.6 M4aH.7 M4aH.8 M4bH.5 M4bH.6 M4bH.7 M4bH.8 M4cH.5 M4cH.6 M4cH.7 M4cH.8 R00.P$1 R0.P$2 U1.5 U2.5 VCC.P$1
VBAT: C05.P$1 R00.P$2 U2.4
pads on no net: BAT+.1 BAT+.2 BAT-.1 BAT-.2 D13.A D13.K D14.A D14.K D15.A D15.K D23.A D23.K D24.A D24.K D25.A D25.K D33.A D33.K D34.A D34.K D35.A D35.K D43.A D43.K D44.A D44.K D45.A D45.K J0.P1 J0.P2 P1a.1 P1a.2 P1b.1 P1b.2 P1c.1 P1c.2 P2a.1 P2a.2 P2b.1 P2b.2 P2c.1 P2c.2 P3a.1 P3a.2 P3b.1 P3b.2 P3c.1 P3c.2 P4a.1 P4a.2 P4b.1 P4b.2 P4c.1 P4c.2 U11.1 U11.7 U11.8 U11.9 U12.5 U12.7 U12.8 U12.21 U21.1 U21.7 U21.8 U21.9 U22.5 U22.7 U22.8 U22.21 U31.1 U31.7 U31.8 U31.9 U32.5 U32.7 U32.8 U32.21 U41.1 U41.7 U41.8 U41.9 U42.5 U42.7 U42.8 U42.21
copper on no net:
  other v1: -15.25,-15.25 15.25,-15.25 -15.25,15.25 15.25,15.25

## Silkscreen, mask and mechanical layers (free items; w line width, h text height)
Mechanical 1:
  lines w0.254: -17.92,-16.92 -17.07,-16.07 ; -17.921,-16.919 cw(c-15.25,-15.25) -18.4,-15.25 cw(c-15.25,-15.25) -17.497,-13.042 ; -17.921,16.919 ccw(c-15.25,15.25) -18.4,15.25 ccw(c-15.25,15.25) -17.497,13.042 ; -17.92,16.92 -17.07,16.07 ; -17.5,-13 -17.5,13 ; -17.077,-16.063 cw(c-15.25,-15.25) -16.063,-17.077 ; -17.077,16.063 ccw(c-15.25,15.25) -16.063,17.077 ; -16.92,-17.92 -16.07,-17.07 ; -16.92,17.92 -16.07,17.07 ; -16.919,-17.921 ccw(c-15.25,-15.25) -15.25,-18.4 15.25,-18.4 ; -16.919,17.921 cw(c-15.25,15.25) -15.25,18.4 15.25,18.4 cw(c15.25,15.25) 16.919,17.921 ; 15.25,-18.402 ccw(c15.25,-15.25) 16.921,-17.923 ; 16.063,-17.077 cw(c15.25,-15.25) 17.077,-16.063 ; 16.063,17.077 ccw(c15.25,15.25) 17.077,16.063 ; 16.07,-17.07 16.922,-17.922 ; 16.07,17.07 16.92,17.92 ; 17.07,-16.07 17.922,-16.922 ; 17.07,16.07 17.92,16.92 ; 17.497,13.042 ccw(c15.25,15.25) 17.921,16.919 ; 17.499,-13.04 cw(c15.25,-15.25) 17.923,-16.921 ; 17.5,-13 17.5,13